# Altium PCB shifter_V2.PcbDoc (part 2 of 2)
Units mil, origin at the board's own origin, x right, y up, seen from the top; angles counter-clockwise.
Board outline 1953.14 x 1638.38 mil, 4 copper layers (Top Layer, Mid-Layer 1, Mid-Layer 2, Bottom Layer); 116 components, 104 nets, 449 pads, 247 vias.
Unrouted connection lines stored in the file: 152.
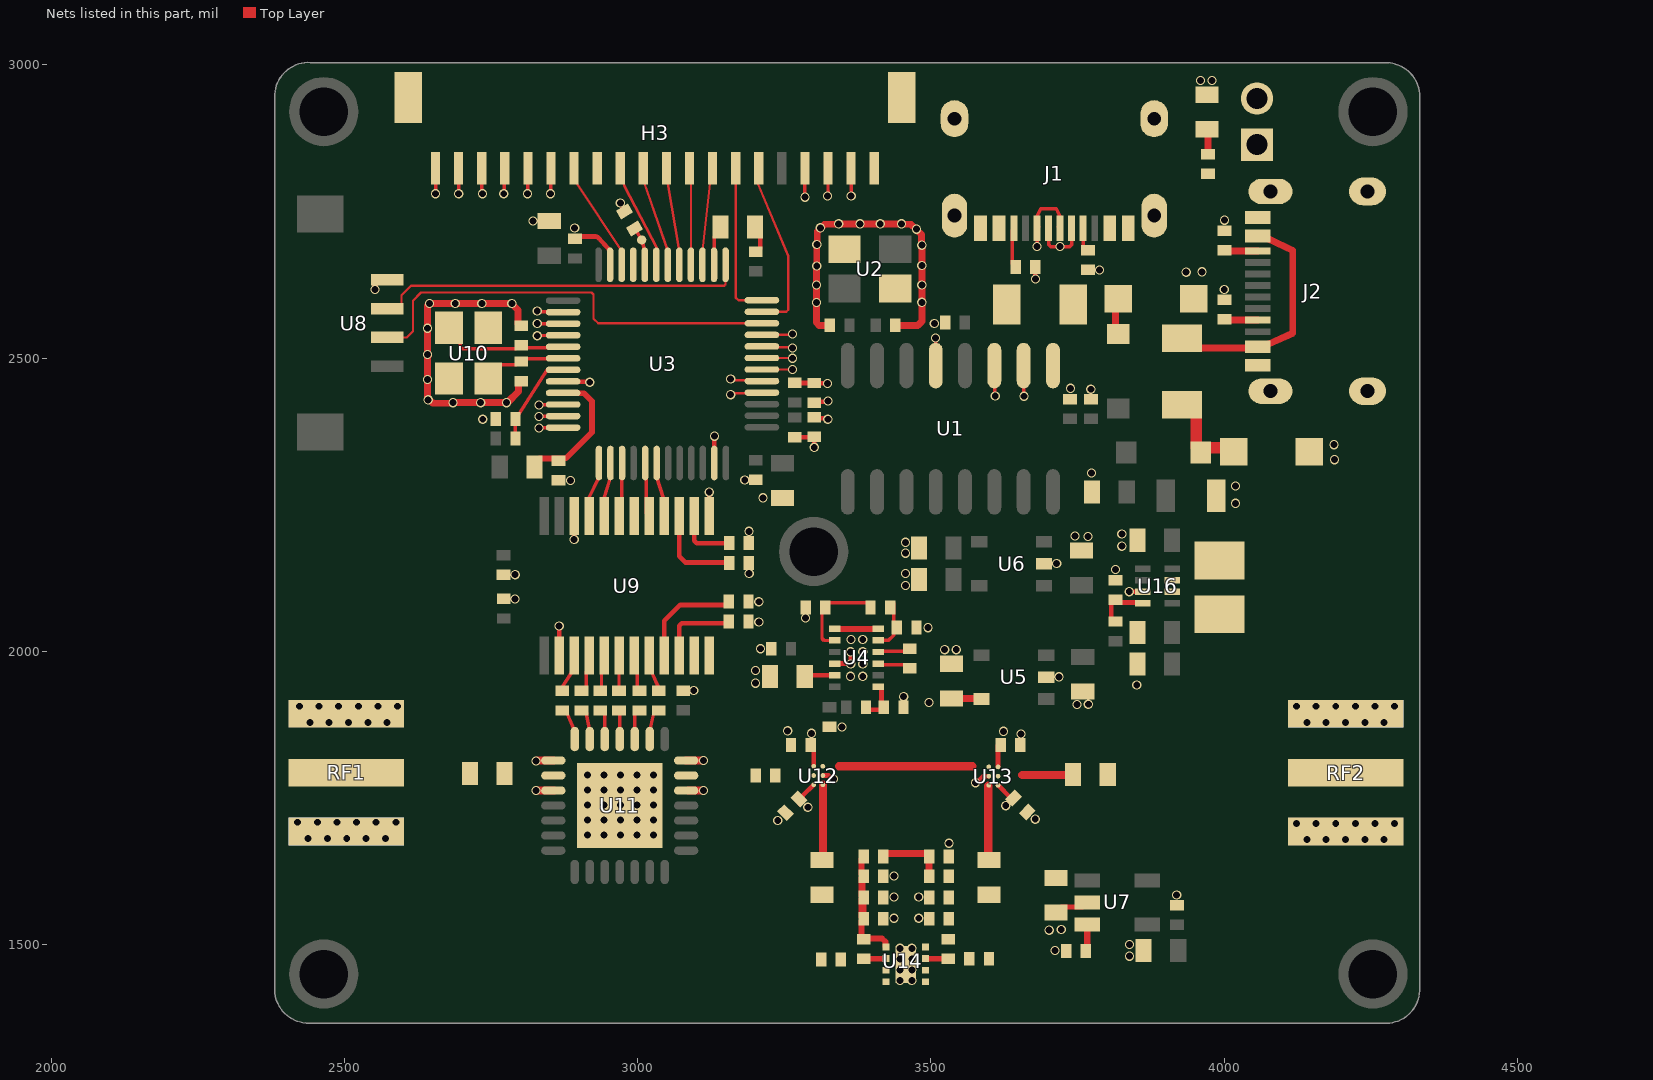
[diagram p4: the nets of this part, all layers, seen from the top]

## Via types
v1: diameter 15.75, hole 11.81, Top Layer to Bottom Layer, tented both sides, 244 vias
v2: diameter 15.75, hole 11.81, Top Layer to Bottom Layer, 3 vias

## Nets (pads, with @x,y where several pads share a name; then routed paths per layer and width w, separated by ;. In a path a pad name is that pad's centre, name@x,y a point inside that pad or via, vN(x,y) a via of type N, cw(c..) or ccw(c..) an arc to the next point about the centre after c; other vN are vias at no path point) (continued)
GND: C1.1 C2.1 C3.1 C4.1 C5.1 C6.2 C7.2 C8.2 C9.2 C10.2 C11.2 C12.2 C13.2 C15.1 C16.1 C17.1 C18.2 C19.2 C20.2 C21.1 C22.1 C23.1 C24.1 C25.1 C26.2 C27.2 C28.2 C29.1 C30.2 C31.2 C32.1 C33.2 C34.1 C35.1 C36.1 C37.1 C38.1 C39.1 C43.1 C46.1 C52.1 C53.2 C54.2 D2.2 D4.2 D5.2 H3.20 H3.21 H3.22 J1.13 J1.14 J1.A1B12 J1.B1A12 J2.13 J2.14 J2.A1B12 J2.B1A12 J3.2 R2.2 R3.2 R4.2 R5.2 R7.2 R10.2 R11.1 R12.1 R14.2 R15.2 R16.1 R17.1 R26.2 R27.2 R33.1 RF1.2 RF1.3 RF2.2 RF2.3 U1.1 U2.2 U2.4 U3.8 U3.23 U3.47 U4.1 U4.4 U4.12 U4.13 U5.2 U6.2 U7.2 U8.1 U9.2 U9.11 U9.12 U9.13 U9.22 U10.2 U10.4 U11.1 U11.3 U11.19 U11.21 U11.29 U12.2 U13.2 U14.0 U14.3 U14.4 U14.5 U14.6 U14.8 U16.7 | length 1940.1
  Top Layer w7.87: U9.2@2865.95,1992.93 v1(2865.95,2043.02) ; U3.8@2872.76,2460.22 2873.36,2459.61 2917.29,2459.61 v1(2918.09,2458.82) ; v1(2891.54,2190.67) U9.22@2891.54,2230.93 ; C22.1@2893.5,2707.4 2927.32,2707.4 ; 2927.36,2707.4 cw(c2927.28,2699.53) 2933.11,2704.82 2938.53,2698.84 2952.86,2683.03 U3.47@2952.86,2659.02 ; v1(2970.28,2764.49) 2975.99,2754.58 R11.1@2977.67,2749.87 ; U9.13@3121.84,2230.93 v1@3121.85,2271.37 ; U3.23@3130.66,2321.02 3130.66,2366.8 v1(3130.71,2366.85) ; R26.2@3301.02,2398.98 3302.82,2397.18 3322.66,2397.18 v1(3324.16,2395.68) ; R27.2@3300.98,2423.94 3302.51,2425.47 3323.01,2425.47 v1(3324.52,2426.97) ; U12.2@3315.77,1788.09 3325.45,1788.09 3331.33,1782.2 v1(3333.46,1782.2) ; U4.4@3335.84,1979.06 v1@3362.99,1979.06 ; v1@3362.99,1998.74 3363.14,1998.59 3363.07,1998.51 3363.07,1978.68 v1@3363.14,1978.61 ; v1(3576.1,1775.83) 3578.23,1775.83 3589.42,1787.01 U13.2@3598.63,1787.01 ; C43.1@3653.06,1839.21 3653.06,1858.43 v1(3653.61,1858.98) ; R4.2@3678.01,2662.6 3678.01,2635 v1(3678.2,2634.81) ; C23.1@3712.91,1554.46 3722.39,1563.94 3758.9,1563.94 U7.2@3766.54,1571.57 ; U7.2@3767.04,1564.14 U7.2@3768.03,1565.12 ; v2(3838.15,2101.65) U16.7@3861.17,2101.65
  Top Layer w9.84: v1(2551.97,2616.85) 2551.97,2628.68 2556.89,2633.6 U8.1@2572.63,2633.6 ; U4.1@3335.84,2038.11 U4.12@3409.84,2038.11 ; U5.2@3696.58,1955.99 U5.2@3697.75,1954.82 ; R12.1@3730.75,1489.12 R12.1@3732.02,1487.85
  Top Layer w11.81: v1(2641.54,2506.12) v1(2641.54,2550.91) 2641.54,2589.76 v1(2644.99,2593.22) v1(2688.78,2593.22) v1(2734.06,2593.22) 2783.42,2593.22 v1@2783.95,2592.68 ; v1@2643.5,2506.12 2643.5,2503.99 2641.54,2502.02 v1(2641.54,2463.31) 2641.54,2429.84 v1(2642.52,2428.86) 2644.65,2428.86 2650.56,2422.95 2683.86,2422.95 v1(2684.84,2423.94) v1(2732.09,2423.94) v1(2776.38,2423.94) 2777.13,2424.69 2778.31,2424.69 2796.72,2443.1 2796.72,2457.76 2799.75,2460.79 C30.2@2801.43,2460.79 ; v1(2785.24,2593.22) 2785.24,2592.15 2795.76,2581.62 2795.76,2558.23 2798.72,2555.28 C28.2@2801.24,2555.28 ; v1@3304.39,2623.29 3304.92,2622.76 v1(3304.92,2594.88) ; v1@3304.8,2594.76 3304.8,2560.38 3309.41,2555.77 C6.2@3327.56,2555.77 ; v1(3304.92,2624.57) 3305.05,2624.7 3305.05,2656.93 3305.29,2657.17 3305.29,2693.67 v1(3305.4,2693.78) ; v1@3304.92,2693.3 3306.15,2694.53 3306.15,2715.82 3311.31,2720.98 v1(3311.31,2722.04) 3312.37,2722.04 3318.48,2728.15 3341.89,2728.15 v1(3342.64,2728.91) v1(3379.06,2728.91) v1(3413.51,2728.91) v1(3449.92,2728.91) 3450.68,2728.15 3465.89,2728.15 3474.22,2719.82 v1(3475.29,2719.82) 3475.29,2718.76 3483.62,2710.42 3483.62,2692.26 3484.86,2691.01 3484.86,2658.53 v1(3484.37,2658.04) v1(3484.37,2624.57) v1@3484.37,2593.98 ; C7.2@3439.1,2555.9 3477.47,2555.9 3484.39,2562.82 v1(3484.37,2595.05)
  Top Layer w13.78: v1(2826.57,1812.72) 2827.11,1812.72 2827.98,1813.59 2855.9,1813.59 U11.1@2856,1813.7 ; v1@2830.51,1762.52 U11.3@2857.06,1762.52 ; U11.21@3082.58,1813.7 v1(3112.01,1813.7) ; U11.19@3086.8,1762.43 v1(3112.01,1762.43)
  other v1: 3447,1438.44 3467.32,1438.44 3447,1456.78 3467.32,1456.78 3447,1475.12 3467.32,1475.12 3838.39,1480.04 3711.42,1489.88 3447,1493.46 3467.32,1493.46 3838.39,1499.72 3701.57,1524.33 3722.24,1525.32 3436.81,1544.74 3479.13,1544.74 3436.81,1581.15 3479.13,1581.15 3919.09,1584.37 3436.81,1616.59 3530.67,1672.55 4141.04,1678.86 4174.02,1678.86 4206.99,1678.86 4239.96,1678.86 4272.93,1678.86 2437.8,1680.83 2470.77,1680.83 2503.74,1680.83 2536.71,1680.83 2569.68,1680.83 2913.93,1686.8 2942.22,1686.8 2970.52,1686.8 2998.82,1686.8 3027.12,1686.8 4123.33,1706.42 4156.79,1706.42 4190.26,1706.42 4223.72,1706.42 4257.18,1706.42 4290.65,1706.42 2420.08,1708.39 2453.54,1708.39 2487.01,1708.39 2520.47,1708.39 2553.94,1708.39 2587.4,1708.39 2913.93,1712.36 2942.22,1712.36 2970.52,1712.36 2998.82,1712.36 3027.12,1712.36 3238.77,1711.53 3677.88,1713.69 2913.93,1737.91 2942.22,1737.91 2970.52,1737.91 2998.82,1737.91 3027.12,1737.91 2826.57,1762.52 2913.93,1763.47 2942.22,1763.47 2970.52,1763.47 2998.82,1763.47 3027.12,1763.47 2913.93,1789.03 2942.22,1789.03 2970.52,1789.03 2998.82,1789.03 3027.12,1789.03 3255.71,1864.32 3348.23,1870.79 2440.75,1878.66 2473.72,1878.66 2506.69,1878.66 2539.67,1878.66 2572.64,1878.66 4141.04,1878.66 4174.02,1878.66 4206.99,1878.66 4239.96,1878.66 4272.93,1878.66 2423.03,1906.22 2456.5,1906.22 2489.96,1906.22 2523.43,1906.22 2556.89,1906.22 2590.35,1906.22 4123.33,1906.22 4156.79,1906.22 4190.26,1906.22 4223.72,1906.22 4257.18,1906.22 4290.65,1906.22 3748.93,1909.2 3768.43,1909.63 3453.47,1922.56 3095.5,1933.15 3850.92,1942.43 3200.59,1945.59 3718.31,1956.42 3362.84,1957.33 3383.66,1957.33 3200.59,1967.24 3363.14,1978.21 3383.66,1978.21 3362.99,1999.05 3383.66,1999.05 3523.43,2002.68 3543.11,2002.68 3209.26,2004.26 3363.62,2019.95 3383.66,2019.95 3495.17,2040.21 3206.49,2050.01 3286.22,2056.81 3206.49,2084.46 2790.55,2089.17 3456.62,2112.32 2790.94,2130.6 3190.06,2132.43 3456.38,2132.43 3814.52,2139.43 3714.36,2149.5 3456.49,2167.22 3825.5,2179.23 3456.54,2185.8 3767.93,2195.84 3745.55,2196.76 3825.5,2199.9 3189.88,2204.55 4019.42,2252.26 3213.61,2261.62 3121.85,2271.38 4019.42,2281.79 2885.41,2291.16 3182.49,2292.16 3774,2304 4188.28,2326.69 4187.3,2352.28 2735.67,2395.61 3772.65,2446.79 3738.14,2448.34 3505.71,2558.78 4000.21,2617.15 3935.26,2646.52 3962.11,2647.02 3787.47,2650.41 3305.18,2657.06 3484.37,2692.49 2892.44,2721.81 2821.51,2733.68 4000.57,2735.2 3959.45,2973.15 3979.13,2973.15
HXT_IN: C28.1 U3.5 U10.1 | length 224
  Top Layer w5.91: U10.1@2677.95,2551.89 2697.26,2532.58 2697.26,2519.3 2700.72,2515.84 2792.32,2515.84 2796.68,2520.2 C28.1@2803.38,2520.2 ; C28.1@2801.24,2521.81 2805.59,2517.47 2845.61,2517.47 2847.36,2519.22 U3.5@2872.76,2519.22
HXT_OUT: C30.1 U3.6 U10.3 | length 142
  Top Layer w5.91: U10.3@2744.88,2465.27 2744.88,2469.21 2764.44,2488.77 2792.85,2488.77 2799.24,2495.16 C30.1@2804.16,2495.16 ; C30.1@2804.96,2498.91 2872.16,2498.91 U3.6@2872.76,2499.52
LED: D6.2 U3.38 | length 54.7
  Top Layer w5.91: U3.38@3130.25,2659.2 3130.25,2707.15 D6.2@3135.03,2711.94
LNA_5V: C23.2 C34.2 C38.2 L3.2 R24.2@3530.39,1616.26
LNA_IN: C44.2 C47.2
LNA_OUT: C45.1 C48.2
NetA4B9: J2.A4B9 J2.B4A9 J3.1 R1.2 X2.2 | length 369.3
  Top Layer w11.81: X2.2@3925.98,2529.06 3938.22,2516.82 4054.8,2516.82 J2.A4B9@4057.32,2519.33 ; J2.B4A9@4075.39,2703.43 4116.93,2683.42 4116.93,2542.57 J2.A4B9@4076.08,2523.89
NetC8_1: C8.1 R8.1 U4.11 | length 87.5
  Top Layer w5.91: U4.11@3409.84,2018.43 3427.43,2018.43 3436.46,2027.46 3436.46,2034.39 C8.1@3442.36,2040.3 ; C8.1@3436.24,2040.08 R8.1@3436.24,2081.96
NetC14_1: C14.1 U4.9 | length 57.3
  Top Layer w5.91: U4.9@3409.84,1979.06 3412.13,1976.76 3454.87,1976.76 3460.8,1970.83 C14.1@3463.75,1970.83
NetC14_2: C14.2 U4.10 | length 57.6
  Top Layer w5.91: U4.10@3409.84,1998.74 3411.3,2000.21 3459.66,2000.21 C14.2@3464.73,2005.28
NetC16_2: C16.2 U4.5 | length 44.8
  Top Layer w7.87: C16.2@3291.01,1959.37 U4.5@3335.84,1959.37
NetC31_1: C31.1 R24.1@3496.92,1616.26 R25.1@3418.89,1649.76 | length 119
  Top Layer w11.81: R25.1@3418.89,1649.76 3418.89,1652.27 3421.84,1655.22 3493.97,1655.22 3496.92,1652.27 R24.1@3496.92,1616.26
NetC32_2: C32.2 C36.2 C39.2 L2.2 R25.2@3385.43,1649.76 U14.1 | length 234.4
  Top Layer w9.84: C36.2@3385.43,1577.57 C39.2@3385.43,1543.94 3381.71,1540.22 3381.71,1512.91 L2.2@3385.41,1509.21 3386.49,1510.29 3416.71,1510.29 3422.47,1504.52 3422.47,1496.44 U14.1@3423.46,1495.45 ; C32.2@3385.43,1616.3 3381.5,1620.22 3381.5,1645.83 R25.2@3385.43,1649.76
  Top Layer w11.81: C39.2@3385.43,1543.94 3382.64,1546.73 3382.64,1577.57 C36.2@3385.43,1580.36 3382.74,1583.04 3382.74,1613.61 C32.2@3385.43,1616.3
NetC40_1: C40.1 U11.2
NetC40_2: C40.2 RF1.1
NetC41_1: C41.1 U12.5
NetC41_2: C41.2 U11.20
NetC42_1: C42.1 RF2.1
NetC42_2: C42.2 U13.5 | length 86.8
  Top Layer w14.09: 3655.56,1789.09 3655.78,1788.87 C42.2@3742.32,1788.87
NetC43_2: C43.2 U13.6 | length 37.3
  Top Layer w7.87: C43.2@3614.33,1840.05 3614.33,1802.89 U13.6@3614.4,1802.78
  other v1: 3623.57,1863.45
NetC44_1: C44.1 L2.1 U14.2 | length 38
  Top Layer w9.84: L2.1@3385.48,1475.77 U14.2@3423.46,1475.77
NetC45_2: C45.2 L3.1 U14.7 | length 38.8
  Top Layer w9.84: U14.7@3490.56,1475.59 L3.1@3529.36,1475.59
NetC47_1: C47.1 U12.1 | length 129.5
  Top Layer w14.09: C47.1@3315.75,1642.83 U12.1@3315.75,1772.36
NetC48_1: C48.1 U13.3 | length 128.7
  Top Layer w14.09: C48.1@3597.93,1641.84 U13.3@3597.93,1770.56
NetD1_2: D1.2 D2.1 X2.1 | length 165.2
  Top Layer w19.68: X2.1@3936.57,2415.28 3943.79,2415.28 3952.38,2406.69 3952.38,2347.89 3956.66,2343.61 D1.2@3962.61,2343.61 ; D1.2@3959.95,2338.75 3968.18,2346.98 4009.67,2346.98 4023.43,2333.23 D2.1@4023.43,2330.83
NetD3_2: D3.2 D4.1 X1.1 | length 71
  Top Layer w11.81: D4.1@3811.42,2605.04 3814.37,2607.99 3814.37,2542.05 D3.2@3813.78,2541.46
NetD5_1: D5.1 R1.1 | length 43.3
  Top Layer w11.81: D5.1@3970.78,2890.09 3972.47,2888.4 R1.1@3972.46,2847.52
NetD6_1: D6.1 R6.1 | length 54.4
  Top Layer w7.87: D6.1@3196.06,2721.69 3208.87,2708.87 3208.87,2686.29 3203.24,2680.66 R6.1@3197.55,2680.66
NetJ1_A4B9: J1.A4B9 J1.B4A9 X1.2
NetJ1_A5: J1.A5 R2.1 | length 36.4
  Top Layer w5.91: R2.1@3759.64,2684.76 J1.A5@3759.65,2721.18
NetJ1_A7: J1.A7 J1.B7 | length 97.3
  Top Layer w5.91: J1.A7@3700.59,2721.18 3700.59,2693.64 3704.05,2690.18 v1(3720.28,2690.18) 3736.5,2690.18 3739.96,2693.64 J1.B7@3739.96,2721.18
NetJ1_B5: J1.B5 R4.1 | length 62.1
  Top Layer w5.91: R4.1@3638.73,2660.7 3638.73,2718.38 J1.B5@3641.54,2721.18 ; R4.1@3638.81,2660.7 R4.1@3639.16,2661.05
NetJ2_A5: J2.A5 R3.1 | length 58.9
  Top Layer w11.81: R3.1@3999.08,2566.3 4000.77,2564.61 J2.A5@4057.32,2564.61
NetJ2_B5: J2.B5 R5.1 | length 58.5
  Top Layer w11.81: R5.1@3999.59,2682.72 J2.B5@4057.32,2682.72 ; R5.1@3999.77,2682.4 R5.1@4000.33,2682.95
NetL5_1: L5.1 U16.3
NetL5_2: L5.2 U16.2
NetR7_1: R7.1 R8.2 U4.2 | length 167.2
  Top Layer w5.91: R7.1@3320.04,2076.28 3320.04,2079.1 3323.91,2082.97 3392.09,2082.97 R8.2@3397.8,2077.26 ; R7.1@3321.99,2078.23 3314.21,2070.44 3314.21,2021.85 3317.67,2018.39 U4.2@3335.84,2018.43
NetR9_2: R9.2 R10.1 U4.7 | length 78.3
  Top Layer w7.87: R9.2@3389.21,1904.47 3393.51,1900.18 3415.43,1900.18 R10.1@3419.72,1904.47 3415.66,1904.47 3415.66,1938.12 3414.1,1939.69 U4.7@3409.84,1939.69
NetR11_2: R11.2 TP1.1 U3.44 | length 66.2
  Top Layer w5.91: R11.2@2994.4,2720.89 2998.67,2715.39 TP1.1@3006.69,2701.5 3011.96,2683.03 U3.44@3011.96,2659.02
NetR12_2: R12.2 U7.3 | length 42.6
  Top Layer w11.81: R12.2@3763.58,1484.46 R12.2@3766.23,1487.11 ; R12.2@3766.54,1495.3 U7.3@3766.54,1534.17
NetR14_1: R14.1 U9.9 | length 183.3
  Top Layer w7.87: U9.9@3045.08,1992.93 3045.08,2051.89 3072.17,2078.98 3150.39,2078.98 3155.31,2083.9 R14.1@3155.31,2084.71
NetR15_1: R15.1 U9.10 | length 138.1
  Top Layer w7.87: U9.10@3070.67,1992.93 3070.67,2043.38 3075.28,2047.99 3152.65,2047.99 R15.1@3155.31,2050.65
NetR16_2: R16.2 U9.15 | length 158.6
  Top Layer w7.87: U9.15@3070.67,2230.93 3070.67,2162.12 3081.5,2151.3 R16.2@3156.02,2151.3
NetR17_2: R17.2 U9.14 | length 108.1
  Top Layer w7.87: U9.14@3096.26,2230.93 3096.26,2188.51 3100.87,2183.89 R17.2@3155.04,2183.89 ; R17.2@3153.18,2182.04 R17.2@3155.04,2183.89 ; R17.2@3156.02,2183.89 R17.2@3155.04,2183.89 ; R17.2@3156.02,2184.88 R17.2@3155.04,2183.89
NetR32_1: R32.1 R33.2 U16.8 | length 82.4
  Top Layer w7.87: R33.2@3807.18,2079.8 3807.18,2055.74 3812.1,2050.82 R32.1@3814.74,2050.82 ; R33.2@3814.74,2087.62 3819.26,2083.11 3860.02,2083.11 U16.8@3861.17,2081.96
NetU12_3: U12.3 U13.1 | length 227.6
  Top Layer w14.09: 3343.31,1804.02 3570.92,1804.02
NRST: C29.2 R13.1 U3.7 | length 132.3
  Top Layer w5.91: R13.1@2791.42,2362.91 C29.2@2791.42,2395.84 2797.32,2404.69 U3.7@2844.95,2479.51
P1: R18.2 U11.28 | length 56
  Top Layer w5.91: R18.2@2871.31,1899.06 2879.18,1894.13 2892.52,1863.82 U11.28@2892.52,1850.22
P1_CTL: R18.1 U9.3 | length 65.6
  Top Layer w5.91: R18.1@2871.31,1932.52 2870.24,1937.11 2886.61,1963.33 U9.3@2891.54,1992.93
P1_IN: U3.13 U9.21 | length 63
  Top Layer w5.91: U9.21@2916.81,2261.85 2933.76,2297 U3.13@2933.76,2321.02
P2: R19.2 U11.27 | length 53.8
  Top Layer w5.91: R19.2@2912.05,1894.13 U11.27@2918.11,1863.82
  Top Layer w7.87: R19.2@2904.18,1899.06 R19.2@2912.05,1894.13 ; U11.27@2918.11,1850.22 U11.27@2918.11,1863.82
P2_CTL: R19.1 U9.4 | length 64.9
  Top Layer w5.91: R19.1@2904.18,1932.52 2912.21,1938.43 2912.21,1963.4 U9.4@2917.13,1992.93
P2_IN: U3.14 U9.20 | length 60.3
  Top Layer w5.91: U9.20@2942.95,2262.29 2953.46,2297 U3.14@2953.46,2321.02
P3: R20.2 U11.26 | length 52.6
  Top Layer w5.91: R20.2@2936.07,1899.06 2943.7,1893.15 U11.26@2943.7,1850.22
P3_CTL: R20.1 U9.5 | length 61.7
  Top Layer w5.91: R20.1@2936.07,1932.52 2938.19,1934.64 2938.19,1965.74 U9.5@2942.72,1992.93
P3_IN: U3.15 U9.19 | length 92.1
  Top Layer w5.91: U9.19@2968.31,2230.93 2972.48,2235.1 2972.48,2320.34 U3.15@2973.16,2321.02
P4: R21.2 U11.25 | length 49
  Top Layer w5.91: R21.2@2967.96,1899.06 2969.29,1893.15 U11.25@2969.29,1850.22
P4_CTL: R21.1 U9.6 | length 60.4
  Top Layer w5.91: R21.1@2967.96,1932.52 2967.99,1938.43 2967.99,1963.4 U9.6@2968.31,1992.93
P4_IN: U9.18
P5: R22.2 U11.24 | length 52.8
  Top Layer w5.91: U11.24@2994.88,1850.22 2994.88,1893.15 R22.2@3002.8,1899.06
P5_CTL: R22.1 U9.7 | length 62
  Top Layer w5.91: U9.7@2993.89,1992.93 2998.81,1963.4 2998.81,1938.43 R22.1@3002.8,1932.52
P5_IN: U3.17 U9.17 | length 93
  Top Layer w5.91: U3.17@3012.56,2321.02 3012.56,2295.62 3014.86,2293.32 3014.86,2235.56 U9.17@3019.49,2230.93
P6: R23.2 U11.23 | length 54.3
  Top Layer w5.91: U11.23@3020.47,1850.22 3020.47,1863.82 3026.82,1893.15 R23.2@3035.68,1899.06
P6_CTL: R23.1 U9.8 | length 56.5
  Top Layer w5.91: U9.8@3019.49,1992.93 3024.41,1963.4 R23.1@3034.78,1938.97
P6_IN: U3.18 U9.16 | length 61
  Top Layer w5.91: U3.18@3032.26,2321.02 3032.26,2297 U9.16@3043.25,2261.71
PA0: H3.3 U3.10 | length 87.7
  Top Layer w5.91: H3.3@2733.87,2823.86 2733.87,2779.44 v1@2735.04,2778.27 ; v1(2831.5,2420) 2831.9,2420.41 2872.35,2420.41 U3.10@2872.76,2420.82
  other v1: 2735.04,2780.24
PA1: H3.2 U3.11 | length 87.3
  Top Layer w5.91: H3.2@2694.5,2823.86 2694.5,2778.45 v1@2694.68,2778.27 ; v1(2831.5,2400.31) 2831.9,2400.72 2872.36,2400.72 U3.11@2872.76,2401.12
  other v1: 2694.59,2780.24
PA2: H3.1 U3.12 | length 89
  Top Layer w5.91: v1@2655.13,2776.48 H3.1@2655.13,2823.86 ; v1(2831.5,2380.63) 2831.89,2381.02 2872.37,2381.02 U3.12@2872.76,2381.42
  other v1: 2655.13,2780.24
PA8: H3.18 U3.29 | length 95.6
  Top Layer w3.94: v1@3157.47,2464.44 3159.73,2462.18 3163.16,2462.18 3163.34,2462 3210.58,2462 U3.29@3211.76,2460.82
  Top Layer w5.91: H3.18@3324.42,2823.86 3324.42,2784.36 v1@3324.61,2784.17
  other v1: 3158.49,2464.44 3323.62,2776.48
PA11: H3.17 U3.32 | length 103.7
  Top Layer w3.94: U3.32@3211.76,2519.82 3213.09,2518.48 3263.55,2518.48 v1@3264.88,2517.15
  Top Layer w5.91: H3.17@3285.05,2823.86 3285.1,2823.81 3285.1,2774.47 v1(3285.14,2774.42)
  other v1: 3263.93,2517.15
PA12: H3.8 U3.33 | length 53.4
  Top Layer w3.94: U3.33@3211.76,2539.52 3262.88,2539.52 v1@3264.48,2541.12
  other v1: 3263.93,2541.12
PB3: H3.13 U3.39 | length 139.7
  Top Layer w3.94: U3.39@3110.36,2659.02 3110.36,2683.03 H3.13@3123.04,2797.99
PB4: H3.12 U3.40 | length 165.9
  Top Layer w3.94: H3.12@3088.2,2823.86 3090.66,2821.4 U3.40@3090.66,2659.02
PB5: H3.11 U3.41 | length 140.6
  Top Layer w3.94: H3.11@3051.38,2797.99 3070.96,2683.03 U3.41@3070.96,2659.02
PB6: H3.10 U3.42 | length 145.5
  Top Layer w3.94: H3.10@3011.31,2797.71 3051.26,2683.03 U3.42@3051.26,2659.02
PB7: H3.9 U3.43 | length 151.8
  Top Layer w3.94: H3.9@2970.09,2823.86 2977.03,2793.8 U3.43@3033.28,2686.68
PB8: U3.45
PB9: H3.7 U3.46 | length 160.9
  Top Layer w3.94: H3.7@2896.52,2796.9 2972.56,2683.03 U3.46@2972.56,2659.02
PB15: H3.19 U3.28 | length 99.4
  Top Layer w3.94: v1(3158.49,2437.57) 3160.71,2439.78 3210.43,2439.78 U3.28@3211.76,2441.12
  Top Layer w5.91: H3.19@3363.79,2823.86 3363.79,2779.44 v1@3363.98,2779.25
  other v1: 3363.98,2776.48
PC13: H3.6 U3.2 | length 89.1
  Top Layer w5.91: v1(2828.54,2580.48) 2829.73,2579.3 2871.78,2579.3 U3.2@2872.76,2578.32 ; v1(2851.18,2780.24) 2851.58,2780.64 2851.58,2823.46 H3.6@2851.98,2823.86
PC14: H3.5 U3.3 | length 89.6
  Top Layer w5.91: v1@2812.21,2778.67 2812.21,2823.46 H3.5@2812.61,2823.86 ; v1(2828.54,2558.75) 2828.61,2558.68 2872.69,2558.68 U3.3@2872.76,2558.62
  other v1: 2811.81,2780.24
PC15: H3.4 U3.4 | length 88.6
  Top Layer w5.91: v1@2772.35,2780.14 2772.35,2822.97 H3.4@2773.24,2823.86 ; v1(2828.54,2538.11) 2828.95,2538.51 2872.36,2538.51 U3.4@2872.76,2538.92
  other v1: 2771.46,2780.24
PF6: H3.15 U3.35 | length 300
  Top Layer w3.94: H3.15@3206.31,2823.86 3203.54,2821.09 3205.06,2819.57 3205.06,2796.93 3256.69,2674.08 3256.69,2582.4 3253.21,2578.92 U3.35@3211.76,2578.92
PF7: H3.14 U3.36 | length 267.2
  Top Layer w3.94: H3.14@3166.86,2823.77 3166.86,2603.43 3171.67,2598.62 U3.36@3211.76,2598.62
RXD: U1.3 U3.30 | length 91.6
  Top Layer w3.94: U3.30@3211.76,2480.52 3262.09,2480.52 v1@3262.6,2481.02
  Top Layer w5.91: U1.3@3609.25,2475.53 3608.87,2475.16 3608.87,2436.25 v2(3609.65,2435.47)
  other v1: 3263.93,2480.52
SWCLK: U3.37 U8.2 | length 636.9
  Top Layer w3.94: U8.2@2572.65,2584.37 2590.36,2584.37 2597.25,2591.26 2597.25,2607.27 2613.35,2623.37 3147.46,2623.37 3149.76,2625.68 U3.37@3149.76,2659.02
SWDIO: U3.34 U8.3 | length 747.2
  Top Layer w3.94: U8.3@2572.65,2535.16 2606.1,2535.16 2616.6,2545.65 2616.6,2597.82 2630.48,2611.71 2921.11,2611.71 2924.47,2608.35 2924.47,2567.18 2932.44,2559.22 U3.34@3211.76,2559.22
TXD: U1.2 U3.31 | length 93.1
  Top Layer w3.94: U3.31@3211.76,2500.12 3263.19,2500.12 v1@3263.58,2499.72
  Top Layer w5.91: v2(3658.88,2434.94) 3658.49,2435.34 3658.49,2474.77 U1.2@3659.25,2475.53
  other v1: 3263.93,2499.72
USBD_P: J1.A6 J1.B6 U1.5 | length 154.7
  Top Layer w5.91: v1(3507.73,2534.4) 3507.91,2534.21 3507.91,2476.87 U1.5@3508.66,2476.13 ; J1.B6@3680.82,2741.22 3687.32,2754.61 3713.87,2754.61 J1.A6@3720.33,2740.14 ; v1@3680.91,2690.82 J1.B6@3680.91,2721.18 J1.B6@3683.86,2724.14 ; J1.A6@3717.33,2724.13 J1.A6@3720.28,2721.18
  other v1: 3680.91,2690.18
V_DPDT1: C35.2 R24.2@3267.74,2365.24 R26.1 U12.6 | length 94.1
  Top Layer w7.87: R24.2@3267.74,2365.24 R26.1@3300.75,2365.24 ; C35.2@3276.02,1739.12 3280.94,1744.04 3280.94,1753.31 U12.6@3300,1772.36 ; v1(3300.97,2347.8) 3300.97,2365.01 R26.1@3300.75,2365.24 ; R26.1@3301.02,2365.51 R26.1@3300.75,2365.24
  other v1: 3289.97,1733.97
V_DPDT2: R25.2@3267.78,2457.68 R27.1 | length 56
  Top Layer w7.87: R25.2@3268.05,2457.4 R27.1@3300.98,2457.4 3303.94,2457.4 3304.43,2456.91 3323.13,2456.91 v1(3323.62,2456.42)
VDD_DPDT: C10.1 C37.2 C46.2 U5.5 U12.4 U13.4 | length 122.1
  Top Layer w7.87: C46.2@3294.7,1840.02 C46.2@3295.03,1839.68 ; U12.4@3300,1803.86 C46.2@3299.98,1839.18 ; U13.4@3614.4,1771.29 3635.92,1749.77 C37.2@3640.51,1749.77
  Top Layer w11.81: C10.1@3535.27,1919.1 3585.83,1919.1 U5.5@3586.35,1918.59
  other v1: 3627.52,1736.64 3296.06,1860.01 3496.78,1912.64
VDDA: C17.2 L1.2 U3.9 | length 233
  Top Layer w9.84: L1.2@2823.73,2314.04 2832.59,2328.64 2861.94,2328.64 2862.39,2329.09 2877.21,2329.09 2877.4,2329.28 2877.75,2329.28 2922.05,2373.57 2922.05,2426.18 2908.11,2440.12 2898.01,2440.12 2897.84,2440.29 2872.99,2440.29 U3.9@2872.76,2440.52
pads on no net: H3.16 J1.A8 J1.B8 J2.A6 J2.A7 J2.A8 J2.B6 J2.B7 J2.B8 RF1.4 RF2.4 U1.6 U1.9 U1.10 U1.11 U1.12 U1.13 U1.14 U1.15 U3.1 U3.16 U3.19 U3.21 U3.22 U5.4 U6.4 U7.1 U8.5 U8.6 U11.4 U11.5 U11.6 U11.7 U11.8 U11.9 U11.10 U11.11 U11.12 U11.13 U11.14 U11.15 U11.16 U11.17 U11.18 U14.
copper on no net: | length 15541
  Top Layer w3.94: 2928.29,2797.43 2992.26,2683.03 2992.26,2659.02
  Top Layer w5.91: 2992.86,2321.02 2993.38,2320.5 2993.38,2231.44 2993.89,2230.93 ; 3245.68,2823.86 3245.77,2823.76 3245.77,2772.45 v1@3245.87,2772.36 ; v1(3457.74,2534.04) 3457.92,2533.86 3457.92,2476.87 3459.25,2475.53
  Top Layer w11.81: 3529.54,1508.88 3530.24,1508.88 3533.19,1511.83 3533.19,1541.1 3530.39,1543.9 3533.01,1546.52 3533.01,1577.7 3530.39,1580.32 3532.82,1582.75 3532.82,1613.82 3530.39,1616.26 ; 3530.39,1614.9 3711.52,1614.9 3712.91,1613.51 ; 3611.86,2721.18 3611.86,2622.11 3628.94,2605.04 ; 3615.94,2721.18 3614.33,2733.19 3646.49,2775.32 3772.61,2775.32 3806.26,2733.33 3804.92,2721.18 3807.87,2718.23 3807.87,2689.71 3817.1,2680.49 3889.46,2680.49 3972.47,2763.5 3972.47,2814.06 ; 3713.64,1614.25 3761.26,1614.25 3766.54,1608.97 3767.75,1610.19
  Mid-Layer 2 w3.94: 2655.13,2780.24 2606.1,2780.24 2566.73,2740.87 2566.73,2426.89 2647.44,2346.18 2797.05,2346.18 2831.5,2380.63 ; 2694.59,2780.24 2666.05,2751.69 2612.01,2751.69 2587.4,2727.09 2587.4,2426.89 2653.35,2360.94 2792.13,2360.94 2831.5,2400.31 ; 2735.04,2780.24 2733.07,2778.27 2733.07,2737.91 2718.31,2723.15 2623.82,2723.15 2609.06,2708.39 2609.06,2425.91 2659.25,2375.71 2787.2,2375.71 2831.5,2420 ; 2771.46,2780.24 2762.13,2770.91 2762.13,2577.95 2801.97,2538.11 2828.54,2538.11 ; 2811.81,2780.24 2801.97,2770.39 2801.97,2570.9 2814.12,2558.75 2828.54,2558.75 ; 2828.54,2580.48 2851.14,2603.08 2851.14,2780.19 ; 3158.49,2437.57 3172.32,2451.39 3172.32,2737.95 3231.32,2796.95 3283.4,2796.95 3324.3,2756.05 3355.61,2756.05 3363.98,2764.42 3363.98,2776.48 ; 3158.49,2464.44 3159.36,2465.3 3159.36,2747.35 3216.94,2804.94 3315.35,2804.94 3323.62,2796.66 3323.62,2776.48 ; v1@3245.87,2772.36 3263.93,2754.3 3263.93,2541.12 ; 3263.93,2480.52 3564.61,2480.52 3609.65,2435.47 ; 3263.93,2499.72 3594.1,2499.72 3658.88,2434.94 ; 3263.93,2517.15 3287.2,2540.42 3287.2,2772.36 3285.14,2774.42 ; 3289.97,1733.97 3277.36,1746.58 3277.36,1964.29 3406.3,2093.23 3406.3,2242.47 3300.97,2347.8 ; v1(3457.74,2534.04) 3632.09,2708.39 3709.45,2708.39 3718.16,2699.67 3718.16,2692.29 3720.28,2690.18 ; 3507.73,2534.4 3663.51,2690.18 3680.91,2690.18
  Mid-Layer 2 w5.91: 3071.65,2366.85 3071.65,2342.75 3075.11,2339.29 3225.2,2339.29 3248.82,2362.91 3306.73,2362.91 3425,2244.65 3425,1965.63 3432.21,1958.42 3432.21,1957.25 ; 3211.42,2364.88 3225.84,2379.3 3428.81,2379.3 3444.7,2363.41 3444.7,2021.44 3836.86,1629.29 3867.77,1629.29 3867.97,1629.49
  Mid-Layer 2 w7.87: 3296.06,1860.01 3332.85,1896.8 3472.08,1896.8 3486.42,1911.14 3495.28,1911.14 3496.78,1912.64 3497.35,1912.08 3519.11,1912.08 3626.5,1804.69 3626.5,1737.66 3627.52,1736.64 ; 3323.62,2456.42 3507.68,2456.42 3507.68,2067.64 3527.54,2047.77 3623.57,1951.74 3623.57,1863.45
  Mid-Layer 2 w10: 2734.06,2321.57 2735.61,2321.57 2739.36,2317.82 2925,2317.82 3273.17,2317.82 3285.9,2305.09 3287.45,2305.09 ; 2749.5,2055.47 2749.5,1885.55 ; 2925.02,2317.84 2925.02,2376.53 2961.59,2413.11 3195.72,2413.11 3219.87,2437.26 3219.87,2647.52 3220.68,2648.34 ; 3284.23,2012.04 3284.23,1995.44 3174.34,1885.55 2749.5,1885.55 ; 3601.27,2081.46 3601.27,2145.48 3644.19,2188.4 3759.78,2303.99 3783.48,2303.99 ; v1(3697.64,1899.33) 3699.19,1899.33 3702.07,1896.46 3702.67,1896.46 3945.65,1653.48 3945.65,1487.88 ; 3945.48,1487.72 3869.89,1412.13 2802.95,1412.13 2749.5,1465.58 2749.5,1885.55
  other v1: 3911.79,1944.62 3146.46,1968.23 3146.46,1992.34 3146.46,2016.46 3245.87,2776.48

## Polygon pours and split planes (outlines as drawn)
no net on Top Layer "NONET_L01_P006" (solid, pour order 6): 3913.99,2115.92 3914.08,2115.82 3932.63,2115.92 3954.28,2122.31 4034.99,2122.31 4034.99,2188.26 3949.36,2188.26 3949.36,2156.91 3932.63,2127.19 3916.78,2127.19
no net on Top Layer "NONET_L01_P007" (solid, pour order 7): 4034.32,2095.13 3953.56,2095.13 3932.75,2107.55 3915.84,2107.55 3915.84,2096.29 3915.68,2096.13 3933.79,2096.13 3949.41,2068.18 3949.41,2030.65 4034.87,2030.65 4034.99,2030.78
no net on Top Layer "NONET_L01_P008" (solid, pour order 8): 3923.98,2079.73 3923.98,1934.55 3897.18,1934.55 3897.18,2080.18
no net on Top Layer "NONET_L01_P005" (solid, pour order 5): 3088.68,2025.31 3156.3,2025.31 3156.3,1959.37 3088.39,1959.37
no net on Top Layer "NONET_L01_P004" (solid, pour order 4): 2721.26,2524.33 2768.5,2524.33 2768.5,2596.18 2721.21,2596.18
no net on Top Layer "NONET_L01_P003" (solid, pour order 3): 2701.58,2492.48 2701.63,2492.43 2701.63,2421.07 2655.64,2421.07 2639.72,2437 2642.17,2439.45 2642.17,2492.72
no net on Top Layer "NONET_L01_P002" (solid, pour order 2): 3412.2,2595.36 3412.2,2642.19 3412.14,2642.26 3412.16,2642.29 3485.44,2642.29 3485.44,2596.35 3484.09,2595
no net on Top Layer "NONET_L01_P001" (solid, pour order 1): 3379.72,2662.29 3379.48,2662.04 3298.83,2662.04 3298.83,2720.84 3301.01,2722.48 3303.97,2726.07 3304.29,2725.75 3380.24,2725.75
no net on Top Layer "NONET_L01_P000" (solid, pour order 0): 2832.48,2263.5 2873.82,2263.5 2873.82,2199.53 2872.83,2198.54 2832.48,2198.54
no net on Mid-Layer 1 "NONET_L-01_P009" (solid, pour order 9): 2421.06,2991.85 2425.98,2996.77 4296.06,2996.77 4329.53,2963.31 4329.53,1411.14 4290.16,1371.77 2427.95,1371.77 2387.6,1412.13 2387.6,2966.26

## Keep-outs
Keep-Out Layer:
  lines w10: 2385.63,1426.6 ccw(c2438.63,1423.93) 2435.96,1370.92 ; 2385.66,2948.68 2385.8,1426.6 ; 2385.76,2948.68 cw(c2438.77,2946.01) 2441.44,2999.01 4280.31,2999.01 ; 2435.11,1370.79 4279.33,1370.79 ; 4272.87,1370.65 ccw(c4275.54,1423.66) 4328.54,1420.98 4328.54,2943.07 ; 4278.35,2998.74 cw(c4275.68,2945.74) 4328.68,2943.07

## Other copper
Top Layer:
  region net GND: 3815.73,2209.58 3815.73,2169.23 3856.69,2169.23 3856.69,2209.58
  region net 5V: 3801.54,2015.11 3801.54,1979.11 3827.57,1979.11 3827.57,2015.11
  region net GND: 3826.33,2112.29 3826.33,2148.29 3803.69,2148.29 3803.69,2112.29
  region net 5V: 2779.3,2064.96 2739.42,2064.96 2739.42,2046.9 2779.3,2046.9
  region net 5V: 3954.63,1470.2 3954.63,1508.5 3926.97,1508.5 3926.97,1470.2
  region net 5V: 3292.45,1993.37 3292.45,2020.57 3274.73,2020.57 3274.73,1993.37
  rectangle net GND: 3409.67,1605.12 3445.67,1627.76
  region net GND: 3735.9,2204.63 3735.9,2177.09 3776.86,2177.09 3776.86,2204.63
  region net GND: 3553.1,2013.26 3514.79,2013.26 3514.79,1966.01 3553.1,1966.01
  region net GND: 4012.38,2711.15 4012.38,2743.63 3988.41,2743.63 3988.41,2711.15
  rectangle net GND: 2725.89,2384.44 2766.25,2407.08
  rectangle net GND: 3829.33,1469.13 3871.76,1508.5
  region net GND: 3950.93,2981.59 3950.93,2939.46 3989.96,2939.46 3989.96,2981.59
  region net GND: 3104.35,1942.01 3068.36,1942.01 3068.36,1923.74 3104.35,1923.74
  region net GND: 3475.49,2141.51 3447.93,2141.51 3447.93,2102.82 3475.49,2102.82
  region net GND: 3727.09,1966.02 3690.87,1966.02 3690.87,1946.33 3727.09,1946.33
  region net GND: 3216.14,2096.17 3180.14,2096.17 3180.14,2072.65 3216.14,2072.65
  region net GND: 3907.98,1595.09 3907.98,1559.09 3930.62,1559.09 3930.62,1595.09
  region net GND: 3970.99,2657.96 3924.57,2657.96 3924.57,2610.71 3970.99,2610.71
  rectangle net GND: 3469.92,1568.75 3505.91,1591.39
  region net GND: 3475.19,2195.76 3447.63,2195.76 3447.63,2157.07 3475.19,2157.07
  region net GND: 3216.64,2062.64 3180.64,2062.64 3180.64,2039.12 3216.64,2039.12
  region net GND: 2799.58,2099.51 2759.7,2099.51 2759.7,2080.26 2799.58,2080.26
  region net GND: 3779.02,1927.81 3740.17,1927.81 3740.17,1899.51 3779.02,1899.51
  region net GND: 3643.69,1866.95 3643.69,1827.05 3662.44,1827.05 3662.44,1866.95
  region net GND: 3248.64,1738.61 3223.18,1713.16 3239.82,1696.53 3265.27,1721.98
  region net GND: 3785.52,2420.04 3785.52,2456.27 3761.69,2456.27 3761.69,2420.04
  region net GND: 3724.3,2159.46 3688.07,2159.46 3688.07,2139.78 3724.3,2139.78
  region net GND: 2798.68,2139.34 2764.23,2139.34 2764.23,2121.59 2798.68,2121.59
  region net GND: 3236.71,2275.3 3198.41,2275.3 3198.41,2247.54 3236.71,2247.54
  rectangle net GND: 3409.88,1568.75 3445.87,1591.39
  region net GND: 3749,2421 3749,2457.22 3725.17,2457.22 3725.17,2421
  rectangle net GND: 3173.92,2283.44 3211.16,2301.29
  region net GND: 3691.86,1714.8 3666.4,1740.26 3650.4,1724.25 3675.85,1698.79
  region net GND: 3237.99,1937.72 3237.99,1976.02 3190.75,1976.02 3190.75,1937.72
  rectangle net GND: 3495.07,2548.94 3531.3,2572.76
  region net GND: 3443.96,1930.47 3443.96,1892.18 3462.24,1892.18 3462.24,1930.47
  rectangle net GND: 3761.5,2641.49 3795.59,2659.41
  region net GND: 4200.99,2362.93 4162.68,2362.93 4162.68,2315.68 4200.99,2315.68
  region net GND: 2840.37,2747.03 2807.87,2747.03 2807.87,2719.21 2840.37,2719.21
  region net GND: 3295.08,2048.94 3295.08,2085.16 3277.36,2085.16 3277.36,2048.94
  region net GND: 3252.24,1868.1 3252.24,1827.74 3271.05,1827.74 3271.05,1868.1
  rectangle net GND: 3469.92,1532.34 3505.91,1554.97
  region net GND: 2893.62,2300.94 2853.26,2300.94 2853.26,2282.24 2893.62,2282.24
  rectangle net GND: 3761.43,2277.31 3788.57,2316
  rectangle net GND: 3693.68,1513.34 3731.98,1553.94
  region net GND: 3198.43,2124.15 3198.43,2160.38 3180.71,2160.38 3180.71,2124.15
  region net GND: 4011.99,2591.86 4011.99,2625.83 3988.4,2625.83 3988.4,2591.86
  region net GND: 2880.71,2730.04 2880.71,2693.82 2904.54,2693.82 2904.54,2730.04
  rectangle net GND: 3467.86,2028.49 3504.08,2052.32
  rectangle net GND: 3409.88,1533.32 3445.87,1555.96
  region net GND: 3539.17,1645.81 3539.17,1681.81 3521.46,1681.81 3521.46,1645.81
  rectangle net GND: 3325.96,1862.25 3356.74,1880.18
  region net GND: 3987.13,2292.06 3987.13,2236.79 4034.37,2236.79 4034.37,2292.06
  region net GND: 3198.52,2176.24 3198.52,2212.47 3180.61,2212.47 3180.61,2176.24
  rectangle net GND: 3702.38,1477.61 3738.38,1500.24
  region net GND: 3668.73,2661.82 3668.73,2626.67 3686.94,2626.67 3686.94,2661.82
  region net GND: 3235.92,2016.51 3199.92,2016.51 3199.92,1992.99 3235.92,1992.99
  region net 3V3: 3784.55,2363.88 3784.55,2400.1 3760.72,2400.1 3760.72,2363.88
  rectangle net 3V3: 3273.26,2293.73 3300.95,2333.03
  region net 3V3: 2717.77,2333.64 2717.77,2295.33 2765.02,2295.33 2765.02,2333.64
  region: 3710.54,1889.94 3710.54,1928.25 3682.87,1928.25 3682.87,1889.94
  region net LNA_IN: 3319.35,1465.28 3319.35,1583.77 3305.26,1583.77 3305.26,1465.28
  region net LNA_OUT: 3606.95,1467.24 3606.95,1582.79 3592.86,1582.79 3592.86,1467.24
  region net NetC40_2: 2722.24,1798.94 2578.54,1798.94 2578.54,1784.84 2722.24,1784.84
  region net NetC43_2: 3609.61,1867.52 3609.61,1827.62 3628.37,1827.62 3628.37,1867.52
  region net NetC44_1: 3383.1,1484.63 3342.75,1484.63 3342.75,1466.91 3383.1,1466.91
  region net NetC45_2: 3571.1,1483.64 3530.74,1483.64 3530.74,1466.91 3571.1,1466.91
  rectangle net VDD_DPDT: 3495.33,1905.33 3535.69,1933.47
  region net 3V3: 3552.45,2120.18 3524.69,2120.18 3524.69,2080.63 3552.45,2080.63
  rectangle net NetD3_2: 3800.1,2550.18 3837.83,2597.42
  rectangle net NetD3_2: 3757.35,2577.53 3798.3,2624.78
  region net V_DPDT1: 3301.89,1734.7 3274.38,1762.22 3260.77,1748.6 3288.28,1721.09
  region net NetC42_1: 4261.61,1797.95 3801.37,1797.95 3801.37,1783.86 4261.61,1783.86
  rectangle net 3V3: 3197.11,2638.92 3228.83,2656.9
  region net VDD_DPDT: 3284.87,1868.41 3284.87,1828.05 3303.68,1828.05 3303.68,1868.41
  region net NetC40_1: 2853.59,1795.32 2764.57,1795.32 2764.57,1781.22 2853.59,1781.22
  region net NetC41_2: 3200.95,1794.91 3093.16,1794.91 3093.16,1780.82 3200.95,1780.82
  region net VDD_DPDT: 3642.64,1765.35 3615.36,1738.08 3628.98,1724.46 3656.25,1751.74
  region net DCIN: 3847.99,2146.2 3848.07,2146.11 3924.91,2146.11 3924.91,2135.84 3924.81,2135.74 3924.74,2135.81 3874.66,2135.81 3874.66,2115.99 3874.82,2115.84 3847.77,2115.84
  region net DCIN: 3924.81,2135.74 3924.9,2135.83 3924.9,2192.18 3898.24,2192.18 3898.24,2135.48
  region net GND: 3866.03,1934.25 3866.03,2022.6 3838.62,2022.6 3838.97,2022.25 3838.97,1933.98
  region net NetU12_3: 3570.92,1810.75 3598.66,1806.63 3598.66,1798.74 3570.92,1796.97
  region net NetU12_3: 3343.31,1796.93 3315.57,1799.93 3315.57,1807.82 3343.31,1811.06
  region net NetC42_2: 3655.56,1782.2 3614.4,1783.09 3614.4,1790.98 3655.56,1795.98
  region net NetC41_1: 3234.41,1798.94 3300,1791.85 3300,1783.96 3234.41,1776.3
  pour cut-out: 3427.95,1692.37 3428.94,1693.36 3504.72,1693.36 3504.72,1542.77 3505.71,1541.78 3503.77,1539.85 3422.47,1539.85 3422.47,1685.55 3418.91,1689.11
  pour cut-out: 3071.65,1820.59 3071.65,1867.83 3259.65,1867.83 3259.65,1733.97 3259.65,1729.41 3110.04,1729.41
  pour cut-out: 3348.23,1775.31 3566.73,1775.31 3573.62,1768.43 3573.62,1650.31 3362.01,1650.31 3349.21,1663.11
  pour cut-out: 2419.09,1857.99 2419.45,1857.64 2865.93,1857.64 2865.93,1729.07 2865.94,1729.06 2419.09,1729.06
  pour cut-out: 3584.45,1857.99 4317.72,1857.99 4317.72,1729.06 3584.45,1729.07

## Silkscreen, mask and mechanical layers (free items; w line width, h text height)
Top Overlay:
  text "IO" at 2614.96,2796.97 h47.24 r90
  text "USB" at 3505.71,2740.87 h47.24 r90
  text "DCIN" at 4118.9,2319.61 h47.24
  text "SWD" at 2397.44,2254.65 h47.24
  text "信通学院CRFICS" at 2775.7,1545.07 h59.06
  text "RFout" at 4035.24,1541.06 h60
  text "RFin" at 2402.36,1537.13 h60
  text "LYY_20261009" at 2813.78,1496.77 h59.06
  text "0.9-1.3GHz 6bits数控移相器" at 2585.43,1437.72 h59.06

## Dimensions
2385.66,2948.68 to 4328.54,2943.07 on Top Overlay
2948.68,2638.8 to 2435.11,1370.79 on Top Overlay